# Altium PCB Watchdog PCB.PcbDoc
Units mm, origin at the board's own origin, x right, y up, seen from the top; angles counter-clockwise.
Board outline 103.05 x 62.58 mm, 4 copper layers (SIG 1, GND, PWR, SIG 2), stack 1.512 mm thick; 43 components, 51 nets, 438 pads, 143 vias.
Unrouted connection lines stored in the file: 83.
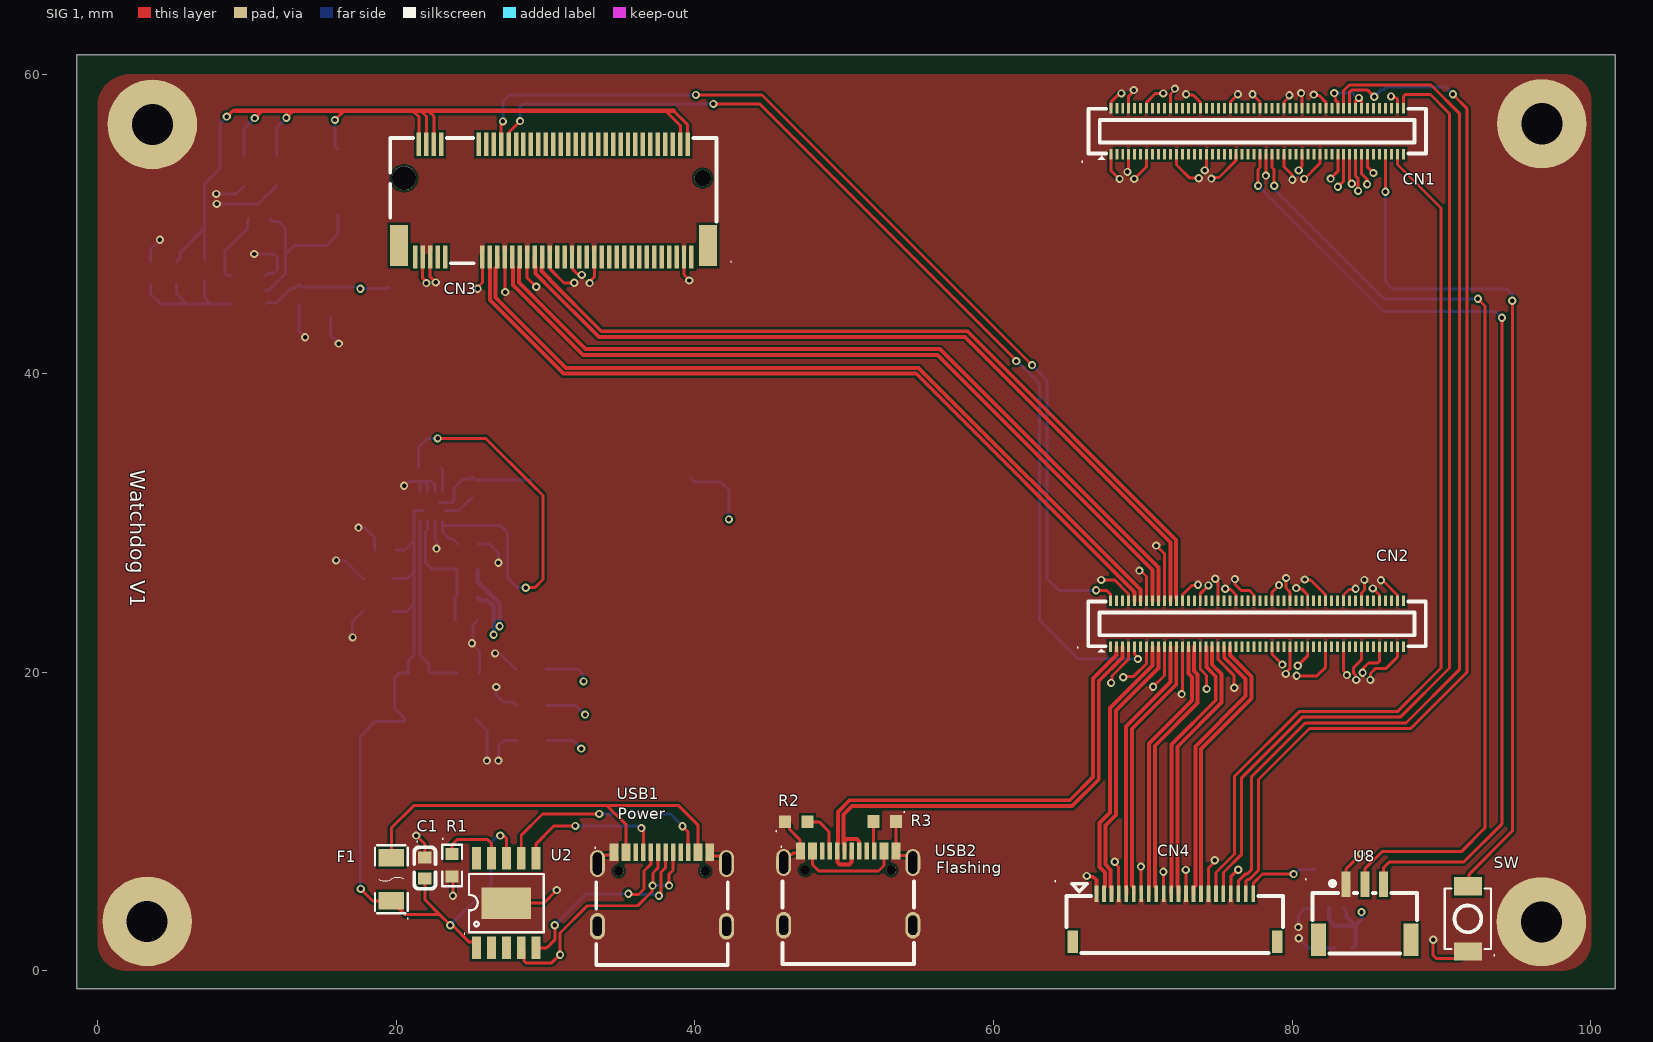
[diagram p0: SIG 1 view]
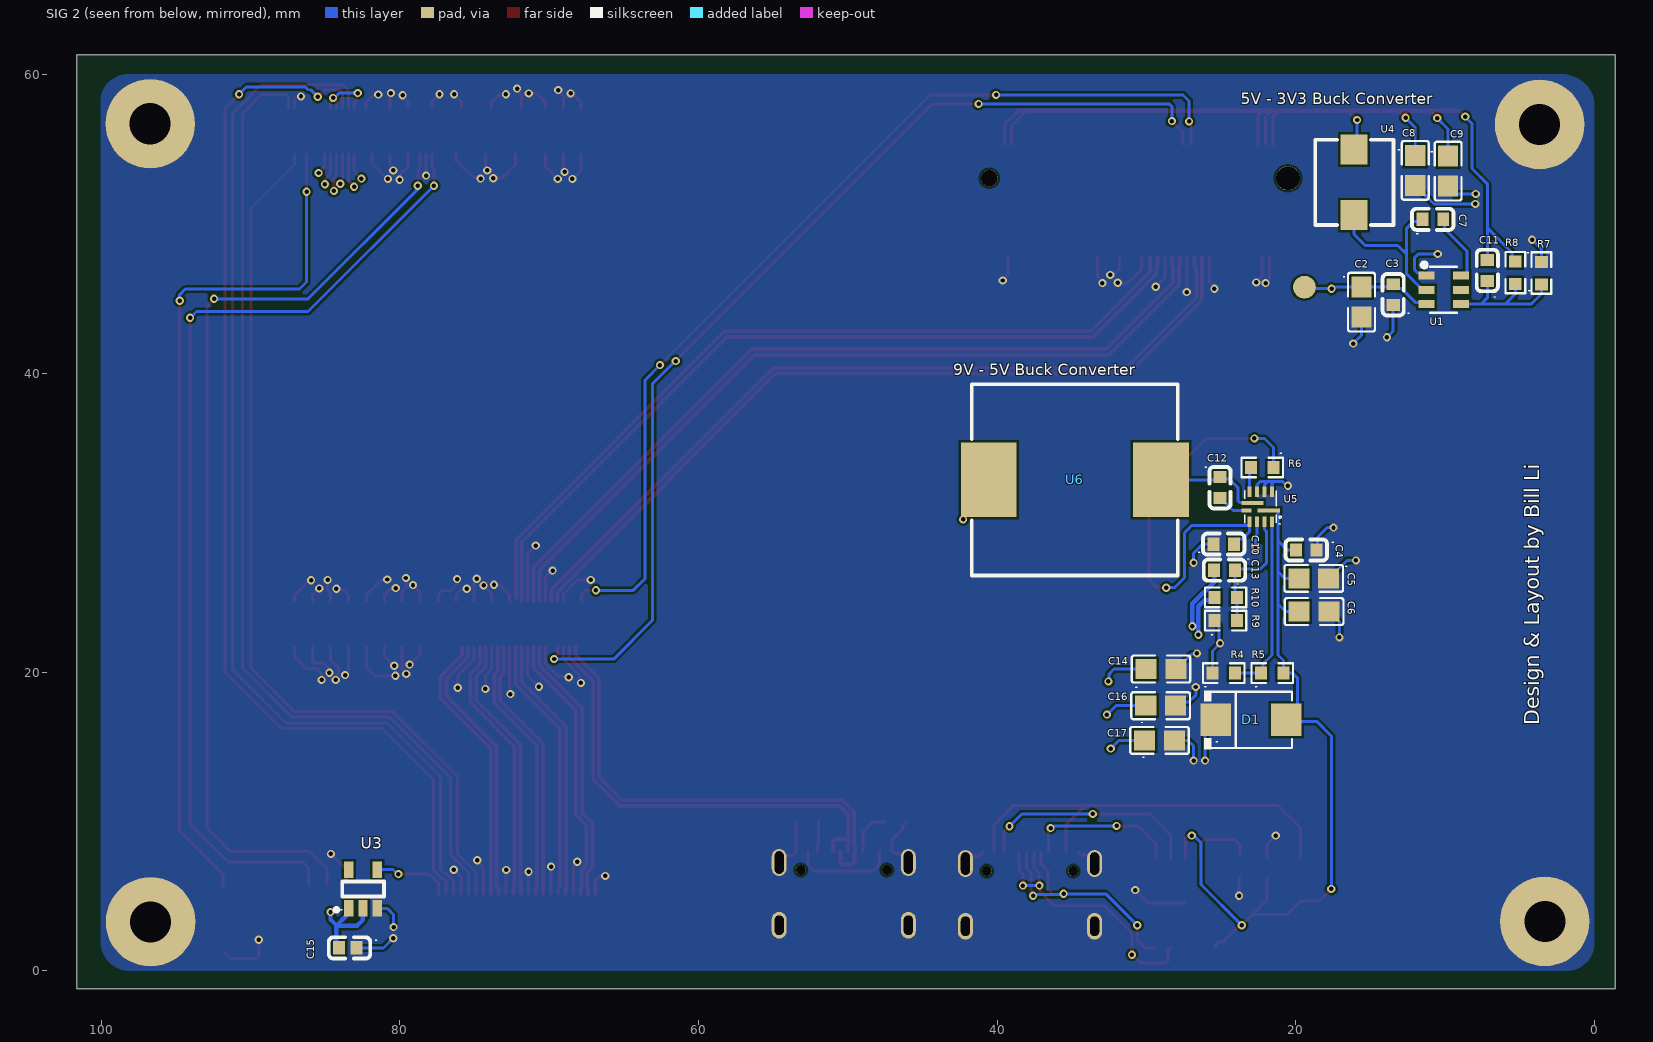
[diagram p1: SIG 2 view, seen from below]
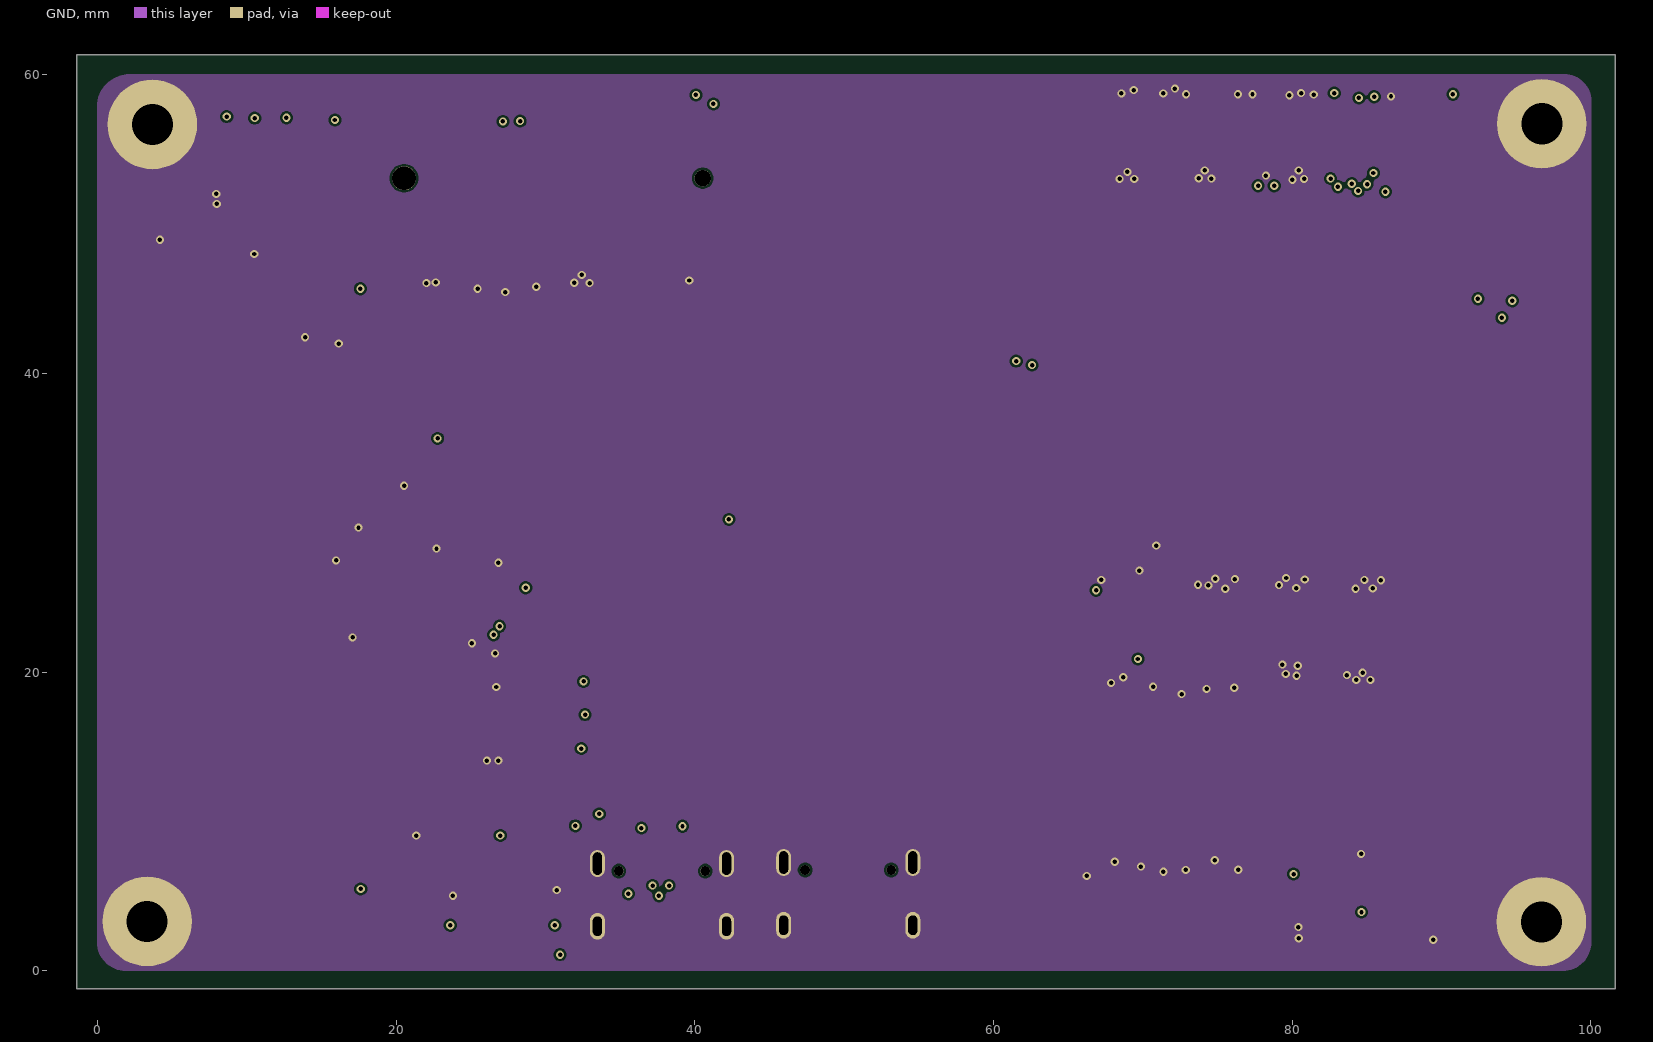
[diagram p2: GND]
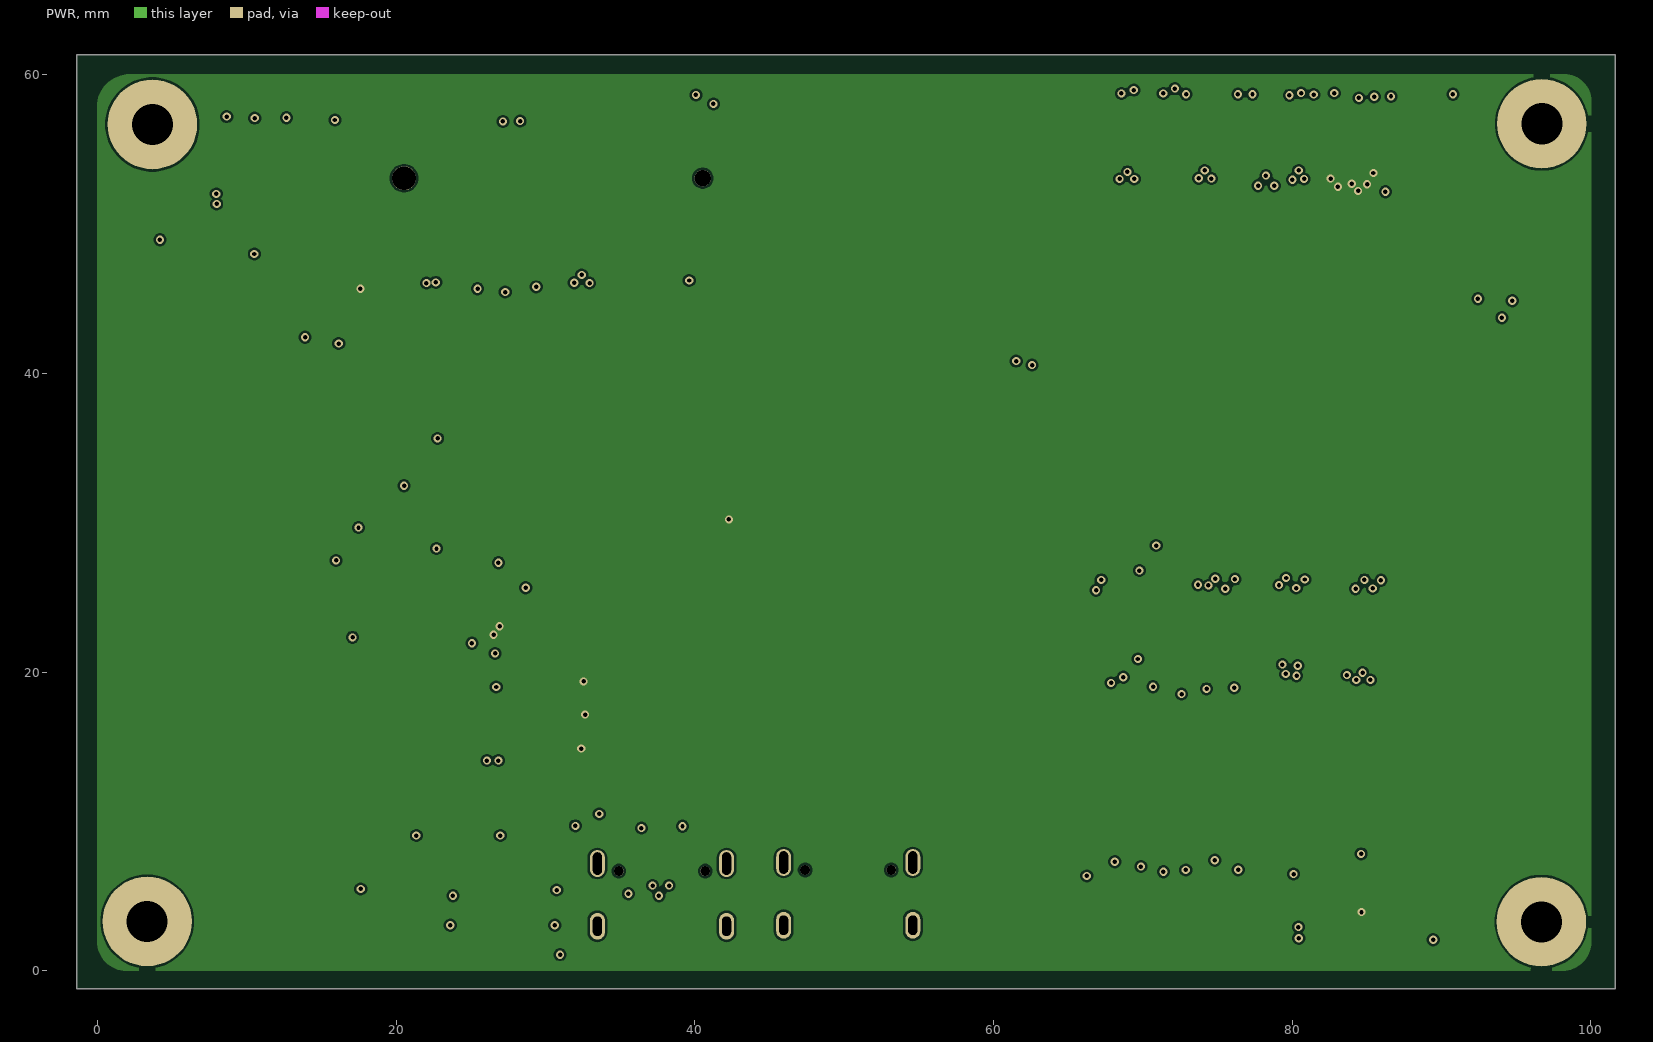
[diagram p3: PWR]
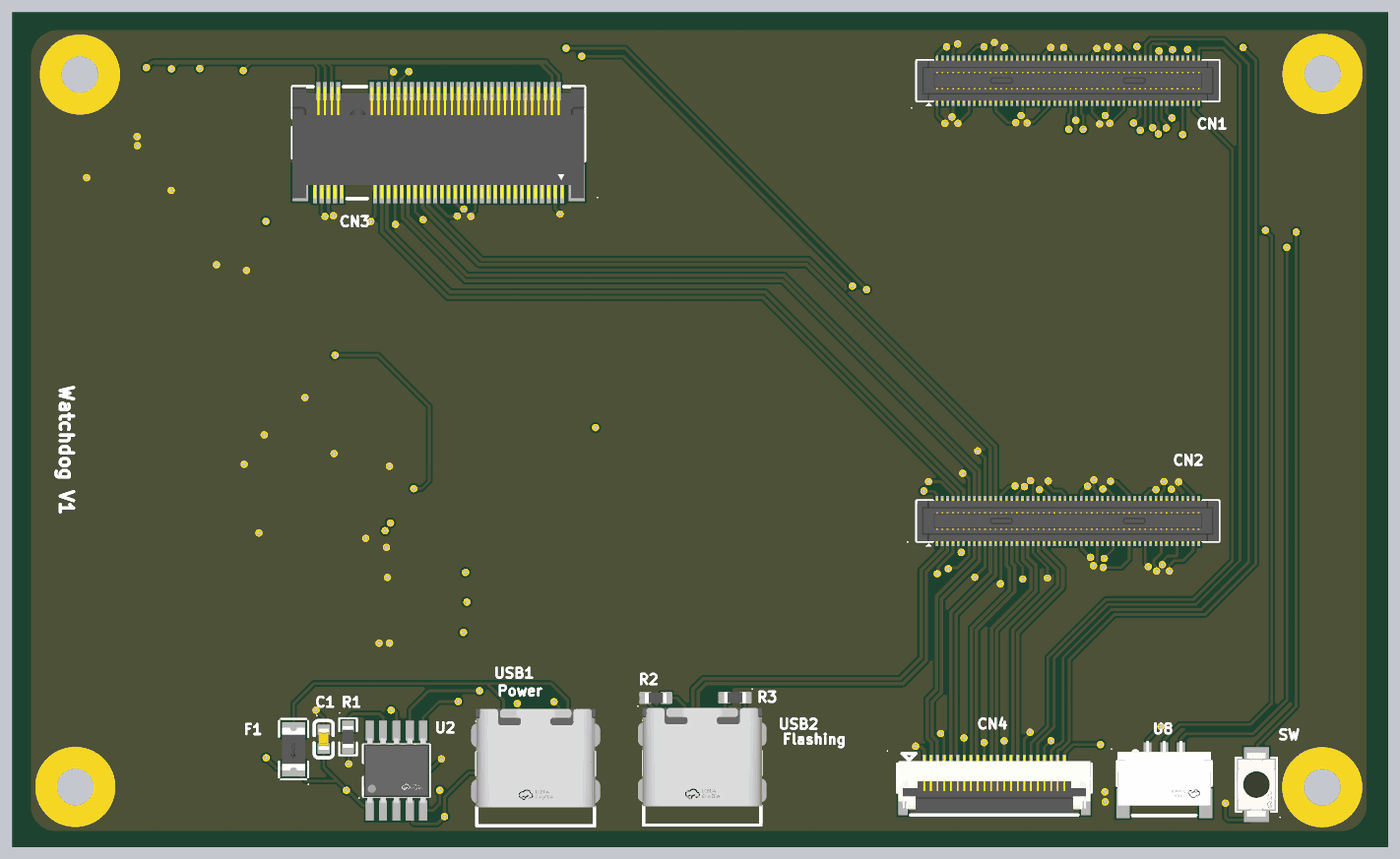
[diagram p4: 3D render of the assembled board from above, using the file's embedded part models]
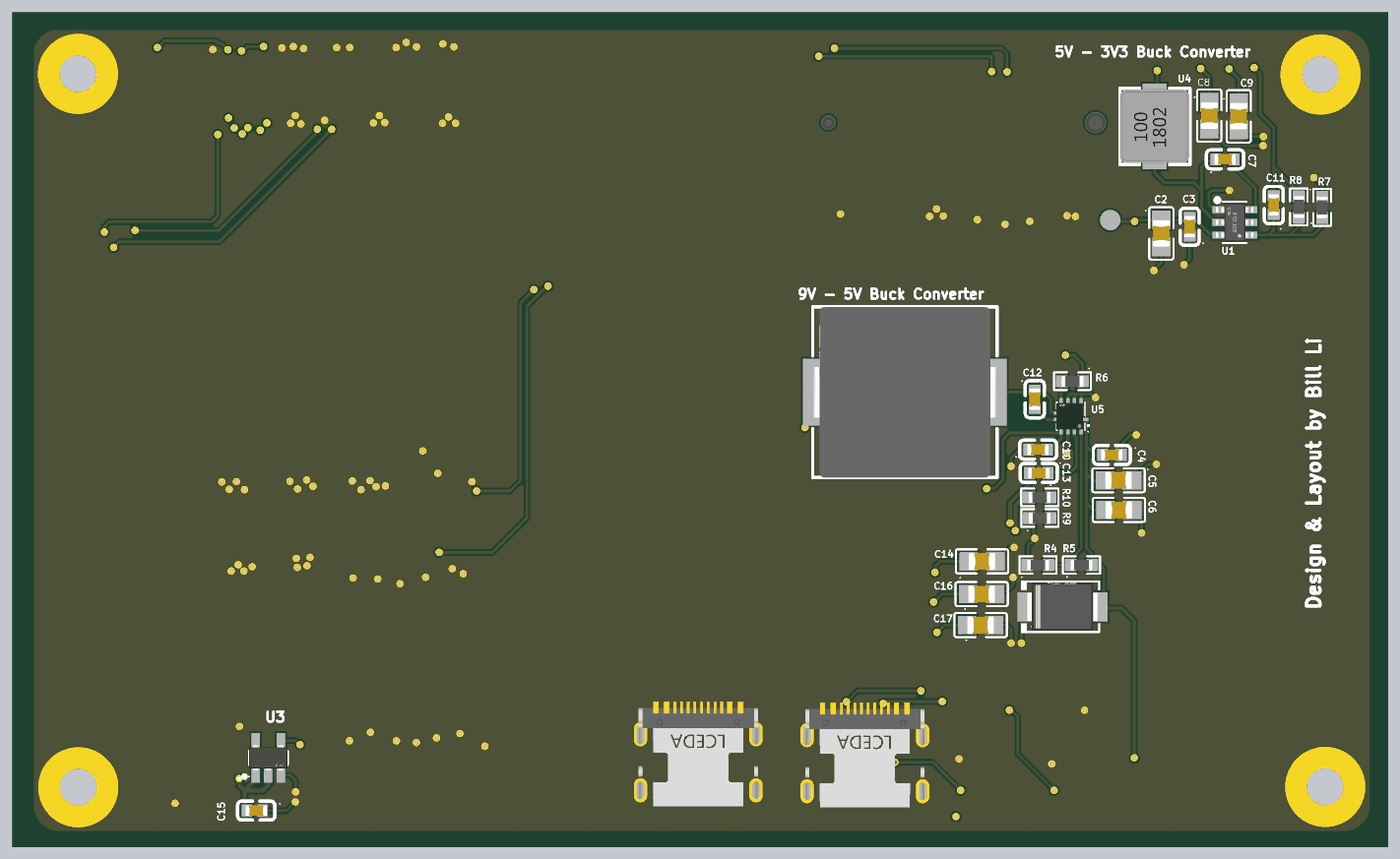
[diagram p5: 3D render of the assembled board from below, using the file's embedded part models]

## Layer stack, top to bottom
Top Solder: solder mask 0.0152, Solder Resist, Dk 3.5
SIG 1: signal copper 0.0432
Dielectric 2: prepreg 0.1999, FR408HR, Dk 3.61
GND: signal copper 0.0175
Dielectric 1: dielectric 0.9906, FR408HR, Dk 3.61
PWR: signal copper 0.0175
Dielectric 3: prepreg 0.1999, FR408HR, Dk 3.61
SIG 2: signal copper 0.0432
Bottom Solder: solder mask 0.0152, Solder Resist, Dk 3.5

## Board outline
-1.4,-1.225 101.65,-1.225 101.65,61.35 -1.4,61.35

## Design rules (kind name [scope] priority, off if disabled: settings)
BoardOutlineClearance [All] p1: gap=0.254 ignorepadtopadclearanceinfootprint=FALSE except(0: Arc-SplitContinuation Track-SplitContinuation SMDPad-SplitContinuation THPad-SplitContinuation Via-SplitContinuation Fill-SplitContinuation Poly-SplitContinuation Region-SplitContinuation Text-SplitContinuation; 0.2: Arc-OutlineEdge Track-CavityEdge Track-CutoutEdge Track-SplitBarrior Poly-CavityEdge Poly-CutoutEdge Poly-SplitBarrior Text-OutlineEdge; 0.4: Track-OutlineEdge SMDPad-OutlineEdge THPad-OutlineEdge Via-OutlineEdge Fill-OutlineEdge Poly-OutlineEdge Region-OutlineEdge)
Clearance CAM_D3_Pair [InNet('CAM_D3_N') vs InNet('CAM_D3_P')] p1: gap=0.1 ignorepadtopadclearanceinfootprint=TRUE
Clearance CAM_D2_Pair [InNet('CAM_D2_N') vs InNet('CAM_D2_P')] p2: gap=0.1 ignorepadtopadclearanceinfootprint=TRUE
Clearance CAM_D1_Pair [InNet('CAM_D1_N') vs InNet('CAM_D1_P')] p3: gap=0.1 ignorepadtopadclearanceinfootprint=TRUE
Clearance CAM_D0_Pair [InNet('CAM_D0_N') vs InNet('CAM_D0_P')] p4: gap=0.1 ignorepadtopadclearanceinfootprint=TRUE
Clearance CAM_CLK_N [InNet('CAM_CLK_N') vs InNet('CAM_CLK_P')] p5: gap=0.1 ignorepadtopadclearanceinfootprint=TRUE
Clearance PCIE_CLK_Pair [InNet('PCIE_CLK_P') vs InNet('PCIE_CLK_N')] p6: gap=0.1 ignorepadtopadclearanceinfootprint=TRUE
Clearance PCIE_RX_Pair [InNet('PCIE_RX_N') vs InNet('PCIE_RX_P')] p7: gap=0.1 ignorepadtopadclearanceinfootprint=TRUE
Clearance PCIE_TX_Pair [InNet('PCIE_TX_N') vs InNet('PCIE_TX_P')] p8: gap=0.1 ignorepadtopadclearanceinfootprint=TRUE
Clearance USB_Pair [InNet('USB_N') vs InNet('USB_P')] p9: gap=0.1 ignorepadtopadclearanceinfootprint=TRUE
Clearance "Regular Clearance" [All] p10: gap=0.15 ignorepadtopadclearanceinfootprint=TRUE
DiffPairsRouting USB_DiffPair [All] p1: maxlimit=0.127 minlimit=0.127 mostfreqgap=0.127 toplayer_minwidth=0.26 toplayer_maxwidth=0.26 toplayer_prefwidth=0.26 bottomlayer_minwidth=0.26 bottomlayer_maxwidth=0.26 bottomlayer_prefwidth=0.26 impedanceprofiledriven=TRUE impedanceprofileid={312E05CD-DBFE-4CD3-A864-9E920D600580} impedanceprofilevalue=90.000000 maxuncoupledlength=12.7
DiffPairsRouting [All] p2: maxlimit=0.127 minlimit=0.127 mostfreqgap=0.127 toplayer_minwidth=0.192 toplayer_maxwidth=0.192 toplayer_prefwidth=0.192 bottomlayer_minwidth=0.192 bottomlayer_maxwidth=0.192 bottomlayer_prefwidth=0.192 impedanceprofiledriven=TRUE impedanceprofileid={0BA38044-EBC8-4669-95C4-1F31DD3EDEAA} impedanceprofilevalue=100.000000 maxuncoupledlength=12.7
HoleSize [All] p1: absolutevalues=TRUE maxlimit=3 minlimit=0.025 maxpercent=80.000 minpercent=20.000
MinimumSolderMaskSliver [All] p1: minsoldermaskwidth=0.05
PlaneConnect [All] p1: planeconnectstyle=Direct reliefexpansion=0.508 reliefentries=4 reliefconductorwidth=0.254 reliefairgap=0.254
PolygonConnect [All] p1: connectstyle=Direct reliefconductorwidth=0.254 reliefentries=4 polygonreliefangle="90 Angle" airgapwidth=0.254
RoutingVias [All] p1: holewidth=0.3 width=0.45 viastyle="Through Hole" minholewidth=0.3 minwidth=0.45 maxholewidth=0.3 maxwidth=0.6
SilkToSilkClearance [All] p1: silktosilkclearance=0.15
SilkToSolderMaskClearance [IsPad] p1: minsilkscreentomaskgap=0.1 clearancetoexposedcopper=TRUE
SolderMaskExpansion [All] p1: expansion=0 istentingtop=FALSE
SupplyNets "Schematic Supply Nets" [InNet('GND')] p1: voltage=0.000
Width [All] p1: maxlimit=0.5 minlimit=0.2 preferedwidth=0.2
24 further rules are at their usual default settings.

## Classes and differential pairs
component class USBC_Protection: C1 F1 R1 R2 R3 U2 USB1 USB2
component class "Power Rails": C2 C3 C4 C5 C6 C7 C8 C9 C10 C11 C12 C13 C14 C15 C16 C17 D1 R4 R5 R6 R7 R8 R9 R10 U1 U3 U4 U5 U6
component class "M.2 & CSI2": CN3 CN4
component class "Amphenol ICC": CN1 CN2 SW U8
differential pair PCIE_TX: +PCIE_TX_P -PCIE_TX_N
differential pair PCIE_RX: +PCIE_RX_P -PCIE_RX_N
differential pair PCIE_CLK: +PCIE_CLK_P -PCIE_CLK_N
differential pair CAM_D3: +CAM_D3_P -CAM_D3_N
differential pair CAM_D2: +CAM_D2_P -CAM_D2_N
differential pair CAM_D1: +CAM_D1_P -CAM_D1_N
differential pair CAM_D0: +CAM_D0_P -CAM_D0_N
differential pair CAM_CLK: +CAM_CLK_P -CAM_CLK_N
differential pair USB: +USB_P -USB_N

## Components (designator, comment, footprint, x,y, rotation, side; value= is the part's Value field where it differs from the comment)
C1 "CC0603KRX5R9BB105" C0603#1 21.925,6.875 r270 top value=1uF
C2 "CL21A226MAQNNNE" C0805 15.6,44.775 r270 bottom value=22uF
C3 "CL10B104JB8NNNC" C0603#1 13.475,45.275 r90 bottom value=100nF
C4 "CL10B104JB8NNNC" C0603#1 19.3,28.175 r0 bottom value=100nF
C5 "CL21A226MAQNNNE" C0805 18.8,26.275 r0 bottom value=22uF
C6 "CL21A226MAQNNNE" C0805 18.775,24.05 r0 bottom value=22uF
C7 "CL10B104JB8NNNC" C0603#1 10.825,50.325 r180 bottom value=100nF
C8 "CL21A226MAQNNNE" C0805 12,53.6 r270 bottom value=22uF
C9 "CL21A226MAQNNNE" C0805 9.8,53.55 r270 bottom value=22uF
C10 "CC0603KRX5R9BB105" C0603#1 24.825,28.575 r180 bottom value=1uF
C11 "0603CG470J500NT" C0603#1 7.175,46.9 r90 bottom value=47pF
C12 "CL10B224KA8NNNC" C0603#1 25.075,32.35 r270 bottom value=220nF
C13 "TCC0603COG330F500CT" C0603#1 24.775,26.825 r0 bottom value=33pF
C14 "CL21A226MAQNNNE" C0805 29.025,20.2 r180 bottom value=22uF
C15 "CC0603KRX5R9BB105" C0603#2 83.375,1.525 r0 bottom value=1uF
C16 "CL21A226MAQNNNE" C0805 29.05,17.75 r180 bottom value=22uF
C17 "CL21A226MAQNNNE" C0805 29.125,15.425 r180 bottom value=22uF
CN1 "10164227-1001A1RLF" CONN-SMD_100P-P0.40_10164227-1001A1RLF 77.66,56.222 r0 top
CN2 "10164227-1001A1RLF" CONN-SMD_100P-P0.40_10164227-1001A1RLF 77.65,23.225 r0 top
CN3 "91302-42-067RDM" CONN-SMD_91302-32-067RDM 30.525,51.575 r180 top
CN4 "CSI Connector" FPC-SMD_22P-P0.50_FH55-22S-0.5SH 72.15,3.549 r0 top
D1 "TVS" SMB_L4.6-W3.6-LS5.3-RD 23,16.8 r180 bottom
F1 "Fuse" F1206 19.675,6.125 r90 top
R1 "CQ03WAJ0682T5E" R0603 23.75,7.05 r270 top value=6.8k
R2 "0603WAF5101T5E" R0603 46.8,9.975 r0 top value=5.1K
R3 "0603WAF5101T5E" R0603 52.725,10 r180 top value=5.1K
R4 "0603WAF1003T5E" R0603 24.828,19.925 r180 bottom value=100k
R5 "0603WAF4533T5E" R0603 21.575,19.925 r180 bottom value=453k
R6 "0603WAF1003T5E" R0603 22.25,33.7 r0 bottom value=100k
R7 "RT0603BRD0722K1L" R0603 3.55,46.725 r270 bottom value=22.1k
R8 "0603WAF1003T5E" R0603 5.3,46.75 r90 bottom value=100k
R9 "FRQ0603F5491TS" R0603 24.7,23.45 r180 bottom value=5.49k
R10 "0603WAF4022T5E" R0603 24.703,25 r0 bottom value=40.2k
SW "TS-1088R-02026" SW-SMD_L3.9-W3.0-P4.45 91.775,3.475 r270 top
U1 "TPS54302DDCR" SOT-23-6_L2.9-W1.6-P0.95-LS2.8-BL 10.1,45.6 r270 bottom
U2 "CH224A" ESSOP-10_L4.9-W3.9-P1.0-LS6.0-TL-EP 27.375,4.525 r0 top
U3 "AP2112K-3.3TRG1" SOT-25-5_L2.9-W1.6-P0.95-LS2.8-BL 82.475,5.475 r180 bottom
U4 "CXP0530-6R8M-AG(6.8uh)" IND-SMD_L5.7-W5.2 16.1,52.8 r90 bottom value=6.8uH
U5 "MP2329GG-Z" QFN-11_L2.0-W2.0-P0.50_MP2384CGG-Z 22.451,31.075 r0 bottom
U6 "CYA1250-3.3UH" IND-SMD_L13.8-W12.8 34.8,32.875 r0 bottom value=3.3uH
U8 "UART" CONN-TH_SM03B-GHS-TB-LF-SN 84.875,3.925 r0 top
USB1 "TYPEC-304J-BCP16" USB-C-SMD_TYPEC-304J-BCP16 37.8,5.456 r0 top
USB2 "TYPEC-304J-BCP16" USB-C-SMD_TYPEC-304J-BCP16 50.275,5.525 r0 top

## Footprints (in the part's own frame and the unit in brackets; to place one, negate y for a bottom-side part, rotate by r counter-clockwise, add the part's x,y. Pads: shape width x height; smd on the part's side, far side on the other; paste and mask are expansions set on the pad)
C0603#1 [mm] "1uF ±10% 50V Ceramic Capacitor X5R 0603"
  rect 0.8x0.9 smd: 1(-0.7,0) 2(0.7,0)
  silkscreen extent -1.81,-0.71 1.39,0.71, body extent -1.3,-0.53 0.3,0.27, height 0.03
C0603#2 [mm] "1uF ±10% 50V Ceramic Capacitor X5R 0603"
  rect 0.8x0.9 smd: 1(-0.475,0) 2(0.7,0)
  silkscreen extent -1.81,-0.71 1.39,0.71, body extent -0.8,-0.4 0.8,0.4, height 0.4
C0805 [mm] "22uF ±20% 25V Ceramic Capacitor X5R 0805"
  rect 1.41x1.35 smd: 1(-1,0) 2(1,0)
  silkscreen extent -1.96,-1.2 1.96,0.9, body extent -1,-0.65 1,0.65, height 0.65
CONN-SMD_100P-P0.40_10164227-1001A1RLF [mm] "100 Position Board to Board Connector Surface Mount,P=0.4mm Gold"
  rect 0.2x0.7 smd: 1(-9.8,-1.54) 2(-9.8,1.54) 3(-9.4,-1.54) 4(-9.4,1.54) 5(-9,-1.54) 6(-9,1.54) 7(-8.6,-1.54) 8(-8.6,1.54) 9(-8.2,-1.54) 10(-8.2,1.54) 11(-7.8,-1.54) 12(-7.8,1.54) 13(-7.4,-1.54) 14(-7.4,1.54) 15(-7,-1.54) 16(-7,1.54) 17(-6.6,-1.54) 18(-6.6,1.54) 19(-6.2,-1.54) 20(-6.2,1.54) 21(-5.8,-1.54) 22(-5.8,1.54) 23(-5.4,-1.54) 24(-5.4,1.54) 25(-5,-1.54) 26(-5,1.54) 27(-4.6,-1.54) 28(-4.6,1.54) 29(-4.2,-1.54) 30(-4.2,1.54) 31(-3.8,-1.54) 32(-3.8,1.54) 33(-3.4,-1.54) 34(-3.4,1.54) 35(-3,-1.54) 36(-3,1.54) 37(-2.6,-1.54) 38(-2.6,1.54) 39(-2.2,-1.54) 40(-2.2,1.54) 41(-1.8,-1.54) 42(-1.8,1.54) 43(-1.4,-1.54) 44(-1.4,1.54) 45(-1,-1.54) 46(-1,1.54) 47(-0.6,-1.54) 48(-0.6,1.54) 49(-0.2,-1.54) 50(-0.2,1.54) 51(0.2,-1.54) 52(0.2,1.54) 53(0.6,-1.54) 54(0.6,1.54) 55(1,-1.54) 56(1,1.54) 57(1.4,-1.54) 58(1.4,1.54) 59(1.8,-1.54) 60(1.8,1.54) 61(2.2,-1.54) 62(2.2,1.54) 63(2.6,-1.54) 64(2.6,1.54) 65(3,-1.54) 66(3,1.54) 67(3.4,-1.54) 68(3.4,1.54) 69(3.8,-1.54) 70(3.8,1.54) 71(4.2,-1.54) 72(4.2,1.54) 73(4.6,-1.54) 74(4.6,1.54) 75(5,-1.54) 76(5,1.54) 77(5.4,-1.54) 78(5.4,1.54) 79(5.8,-1.54) 80(5.8,1.54) 81(6.2,-1.54) 82(6.2,1.54) 83(6.6,-1.54) 84(6.6,1.54) 85(7,-1.54) 86(7,1.54) 87(7.4,-1.54) 88(7.4,1.54) 89(7.8,-1.54) 90(7.8,1.54) 91(8.2,-1.54) 92(8.2,1.54) 93(8.6,-1.54) 94(8.6,1.54) 95(9,-1.54) 96(9,1.54) 97(9.4,-1.54) 98(9.4,1.54) 99(9.8,-1.54) 100(9.8,1.54)
  silkscreen extent -11.74,-2.08 11.3,1.5, body extent -11.3,-1.69 11.3,1.69, height 0.03
CONN-SMD_91302-32-067RDM [mm] "67P Surface Mount, Right Angle SMD,P=0.5mm Centronics Connectors RoHS"
  rect 0.3x1.55 smd: 1(-9.25,3.775) 2(-9,-3.775) 3(-8.75,3.775) 4(-8.5,-3.775) 5(-8.25,3.775) 6(-8,-3.775) 7(-7.75,3.775) 8(-7.5,-3.775) 9(-7.25,3.775) 10(-7,-3.775) 11(-6.75,3.775) 12(-6.5,-3.775) 13(-6.25,3.775) 14(-6,-3.775) 15(-5.75,3.775) 16(-5.5,-3.775) 17(-5.25,3.775) 18(-5,-3.775) 19(-4.75,3.775) 20(-4.5,-3.775) 21(-4.25,3.775) 22(-4,-3.775) 23(-3.75,3.775) 24(-3.5,-3.775) 25(-3.25,3.775) 26(-3,-3.775) 27(-2.75,3.775) 28(-2.5,-3.775) 29(-2.25,3.775) 30(-2,-3.775) 31(-1.75,3.775) 32(-1.5,-3.775) 33(-1.25,3.775) 34(-1,-3.775) 35(-0.75,3.775) 36(-0.5,-3.775) 37(-0.25,3.775) 38(0,-3.775) 39(0.25,3.775) 40(0.5,-3.775) 41(0.75,3.775) 42(1,-3.775) 43(1.25,3.775) 44(1.5,-3.775) 45(1.75,3.775) 46(2,-3.775) 47(2.25,3.775) 48(2.5,-3.775) 49(2.75,3.775) 50(3,-3.775) 51(3.25,3.775) 52(3.5,-3.775) 53(3.75,3.775) 54(4,-3.775) 55(4.25,3.775) 56(4.5,-3.775) 57(4.75,3.775) 58(5,-3.775) 67(7.25,3.775) 68(7.5,-3.775) 69(7.75,3.775) 70(8,-3.775) 71(8.25,3.775) 72(8.5,-3.775) 73(8.75,3.775) 74(9,-3.775) 75(9.25,3.775)
  rect 1.2x2.75 smd: 76(-10.35,3) 76(10.35,3)
  round 1.1 hole 1.1 unplated: ""(-10,-1.5)
  round 1.6 hole 1.6 unplated: ""(10,-1.5)
  silkscreen extent -11.93,-4.19 10.92,4.19, body extent -10.92,-4.23 10.92,4.12, height 0.7
CONN-TH_SM03B-GHS-TB-LF-SN [mm] "Connector Header 3 position 1.25mm Pitch 1A Surface Mount, Right Angle -25?~+85?"
  rect 0.6x1.7 smd: 1(-1.25,1.854) 2(0,1.854) 3(1.25,1.854)
  rect 1x2.2 smd: 4(3.1,-1.854) 5(-3.1,-1.854)
  silkscreen extent -3.98,-2.77 3.5,2.23, body extent -3.5,-2.77 3.5,2.08, height 0.03
ESSOP-10_L4.9-W3.9-P1.0-LS6.0-TL-EP [mm] "Power Receiver Controller 1C 140W ESSOP-10 Power Management - Specialized RoHS"
  rect 0.6x1.5 smd: 1(-2,-3) 2(-1,-3) 3(0,-3) 4(1,-3) 5(2,-3) 6(2,3) 7(1,3) 8(0,3) 9(-1,3) 10(-2,3)
  rect 3.3x2.1 smd: 11(0,0)
  silkscreen extent -2.83,-2.08 2.5,1.95, body extent -2.45,-3 2.45,3, height 0.73
F1206 [mm] "3A Fuse Surface Mount 1206"
  rect 1.19x1.728 smd: 1(-1.445,0) 2(1.445,0)
  silkscreen extent -2.65,-1.13 2.27,1.09, body extent -1.6,-0.85 1.6,0.85, height 0.03
FPC-SMD_22P-P0.50_FH55-22S-0.5SH [mm] "Flip-Top -55?~+85? 22P 0.5mm 500mA 50V Gold Surface Mount, Right Angle Phosphor bronze SMD,P=0.5mm FFC, FPC (Flat Flexible) Connector Assemblies RoHS"
  rect 0.7x1.5 smd: 0(-6.85,-1.601) 0(6.85,-1.601)
  rect 0.25x1.1 smd: 1(-5.248,1.599) 2(-4.749,1.599) 3(-4.251,1.601) 4(-3.75,1.601) 5(-3.25,1.601) 6(-2.751,1.601) 7(-2.251,1.601) 8(-1.75,1.601) 9(-1.25,1.601) 10(-0.751,1.601) 11(-0.25,1.601) 12(0.25,1.601) 13(0.749,1.601) 14(1.25,1.601) 15(1.75,1.601) 16(2.25,1.601) 17(2.749,1.601) 18(3.25,1.601) 19(3.749,1.601) 20(4.249,1.601) 21(4.75,1.601) 22(5.25,1.601)
  silkscreen extent -8.03,-2.36 7.25,2.48, body extent -7.2,-2.35 7.2,1.9, height 0.03
IND-SMD_L5.7-W5.2 [mm] "3.5A 6.8uH ±20% 5A 70m? Molded inductor SMD,5.7x5.2mm Fixed Inductors"
  rect 2x1.8 smd: 1(-2.2,0) 2(2.2,0)
  silkscreen extent -2.88,-2.64 2.85,2.6, body extent -2.85,-2.6 2.85,2.61, height 2.8
IND-SMD_L13.8-W12.8 [mm] "20A 3.3uH ±20% 32A Molded inductor SMD,13.8x12.8mm Fixed Inductors"
  rect 3.735x5 smd: 1(-5.768,0) 2(5.768,0)
  silkscreen extent -6.93,-6.43 6.9,6.4, body extent -6.9,-6.4 6.9,6.4, height 6
QFN-11_L2.0-W2.0-P0.50_MP2384CGG-Z [mm] "QFN-11_L2.0-W2.0-P0.50_MP2384CGG-Z"
  rect 1.5x0.25 smd: 1(-0.651,0.25) 6(0.451,-0.25)
  rect 0.25x0.7 smd: 2(-0.85,-1) 3(-0.35,-1) 4(0.15,-1) 5(0.65,-1) 8(0.65,1) 9(0.15,1) 10(-0.35,1) 11(-0.85,1)
  rect 0.7x0.25 smd: 7(0.85,0.25)
  silkscreen extent -1.47,-1.06 0.98,1.18, body extent -1,-1 1,1, height 0.91
R0603 [mm] "6.8k? ±5% 100mW 0603 Thick Film Resistor AEC-Q200"
  rect 0.806x0.864 smd: 1(-0.753,0) 2(0.753,0)
  silkscreen extent -1.81,-0.66 1.39,0.66, body extent -0.4,-0.81 0.4,0.81, height 0.03
SMB_L4.6-W3.6-LS5.3-RD [mm] "21.5VC Clamp 28A@10/1000us Ipp TVS DIODE DO-214AA"
  rect 2.047x2.192 smd: 1(-2.361,0) 2(2.361,0)
  silkscreen extent -3.12,-1.96 2.74,1.96, body extent -2.7,-1.8 2.7,1.8, height 2
SOT-23-6_L2.9-W1.6-P0.95-LS2.8-BL [mm] "Buck Switching Regulator IC Adjustable 1 Output 3A TSOT-23-6"
  rect 0.532x1.072 smd: 1(-0.95,-1.149) 2(0,-1.149) 3(0.95,-1.149) 4(0.95,1.149) 5(0,1.149) 6(-0.95,1.149)
  silkscreen extent -1.82,-1.45 1.54,0.89, body extent -1.45,-1.41 1.45,1.41, height 1.6
SOT-25-5_L2.9-W1.6-P0.95-LS2.8-BL [mil] "3.3V Positive Fixed SOT-25-5 Voltage Regulators - Linear, Low Drop Out (LDO) Regulators RoHS"
  rect 24.5x43.5 smd: 1(-37.39,-51.18) 2(-0.02,-51.18) 3(37.39,-51.18) 4(37.39,51.18) 5(-37.39,51.18)
  silkscreen extent -75,-60 56,20, body extent -57,-55 57,55, height 43
SW-SMD_L3.9-W3.0-P4.45 [mm] "Tactile Switch SPST 2mm 3.9mm x 2.93mm Surface Mount"
  rect 1.23x1.86 smd: 1(-2.185,0) 2(2.185,0)
  silkscreen extent -2.03,-1.54 2.48,1.8, body extent -2.4,-1.45 2.4,1.45, height 0.03
USB-C-SMD_TYPEC-304J-BCP16 [mm] "USB-C (USB TYPE-C) Receptacle Connector 16 Position Surface Mount, Right Angle"
  rrect100% 1x1.8 hole 0.6 slot 1.5 at 90 deg: 13(-4.325,1.719) 14(4.325,1.719)
  rrect100% 1x1.8 hole 0.6 slot 1.3 at 90 deg: 15(-4.325,-2.481) 16(4.325,-2.481)
  rect 0.6x1.15 smd: A1B12(-3.2,2.481) A4B9(-2.4,2.481) B1A12(3.2,2.481) B4A9(2.4,2.481)
  rect 0.3x1.15 smd: A5(-1.25,2.481) A6(-0.25,2.481) A7(0.25,2.481) A8(1.25,2.481) B5(1.75,2.481) B6(0.75,2.481) B7(-0.75,2.481) B8(-1.75,2.481)
  round 0.65 hole 0.65 unplated: ""(-2.89,1.219) ""(2.89,1.219)
  silkscreen extent -4.5,-5.08 4.4,2.8, body extent -4.47,-5.07 4.47,2.78, height 2

## Part data
C1 C10 C15: "1uF ±10% 50V Ceramic Capacitor X5R 0603", Name=C128624, Source=JLCPCB
C2 C5 C6 C8 C9 C14 C16 C17: "22uF ±20% 25V Ceramic Capacitor X5R 0805", Name=C45783, Source=JLCPCB
C3 C4 C7: "100nF ±5% 50V Ceramic Capacitor X7R 0603", Name=C24452, Source=JLCPCB
C11: "47pF ±5% 50V Ceramic Capacitor C0G 0603", Name=C94904, Source=JLCPCB
C12: "220nF ±10% 25V Ceramic Capacitor X7R 0603", Name=C21120, Source=JLCPCB
C13: "33pF C0G ±1% 50V 0603 Ceramic Capacitors", Name=C48543706, Source=JLCPCB
CN1 CN2: "100 Position Board to Board Connector Surface Mount,P=0.4mm Gold", Name=C6782225, Source=JLCPCB
CN3: "67P Surface Mount, Right Angle SMD,P=0.5mm Centronics Connectors RoHS", Name=C601195, Source=LCSC
CN4: library part FH55-22S-0.5SH, "Flip-Top -55â„ƒ~+85â„ƒ 22P 0.5mm 500mA 50V Gold Surface Mount, Right Angle Phosphor bronze SMD,P=0.5mm FFC, FPC (Flat Flexible) Connector Assemblies RoHS", Name=C5182313, Source=LCSC
D1: library part SMBJ12A_C151251, "21.5VC Clamp 28A@10/1000us Ipp TVS DIODE DO-214AA", Name=C151251, Source=JLCPCB
F1: library part 1206T3A63V, "3A Fuse Surface Mount 1206", Name=C354897, Source=JLCPCB
R1: "6.8kÎ© Â±5% 100mW 0603 Thick Film Resistor AEC-Q200", Name=C2770993, Source=JLCPCB
R2 R3: "5.1kÎ© Â±1% 100mW 0603 Thick Film Resistor", Name=C23186, Source=JLCPCB
R4 R6 R8: "100kÎ© Â±1% 100mW 0603 Thick Film Resistor", Name=C25803, Source=JLCPCB
R5: "453kÎ© Â±1% 100mW 0603 Thick Film Resistor", Name=C25818, Source=JLCPCB
R7: "22.1kÎ© 100mW 75V Thin Film Resistor Â±25ppm/â„ƒ Â±0.1% 0603 Chip Resistor - Surface Mount RoHS", Name=C723484, Source=JLCPCB
R9: "5.49kÎ© 100mW 75V Thick Film Resistor Â±100ppm/â„ƒ Â±1% 0603 Chip Resistor - Surface Mount", Name=C54102278, Source=JLCPCB
R10: "40.2kÎ© Â±1% 100mW 0603 Thick Film Resistor", Name=C12447, Source=JLCPCB
SW: "Tactile Switch SPST 2mm 3.9mm x 2.93mm Surface Mount", Name=C455280, Source=JLCPCB
U1: library part TPS54302DDCR_C311983, "Buck Switching Regulator IC Adjustable 1 Output 3A TSOT-23-6", Name=C311983, Source=JLCPCB
U2: "Power Receiver Controller 1C 140W ESSOP-10 Power Management - Specialized RoHS", Name=C42459160, Source=JLCPCB
U3: "3.3V Positive Fixed SOT-25-5 Voltage Regulators - Linear, Low Drop Out (LDO) Regulators RoHS", Name=C51118, Source=JLCPCB
U4: library part CXP0530-6R8M-AG_6.8UH, "3.5A 6.8uH Â±20% 5A 70mÎ© Molded inductor SMD,5.7x5.2mm Fixed Inductors", Name=C7461350, Source=JLCPCB
U6: "20A 3.3uH ±20% 32A Molded inductor SMD,13.8x12.8mm Fixed Inductors", Name=C19268654, Source=JLCPCB
U8: library part SM03B-GHS-TB_LF_SN, "Connector Header 3 position 1.25mm Pitch 1A Surface Mount, Right Angle -25â„ƒ~+85â„ƒ", Name=C514175, Source=JLCPCB
USB1 USB2: "USB-C (USB TYPE-C) Receptacle Connector 16 Position Surface Mount, Right Angle", Name=C2835315, Source=JLCPCB
U5: Name=C5349327, Source=JLCPCB

## Free pads (board coordinates)
  round 6 hole 2.75: 1(3.675,56.675) 2(3.325,3.3) 3(96.725,56.725) 4(96.7,3.275)
  round 1.524 smd far side paste-2539.97: TP(19.425,45.775)

## Via types
v1: diameter 0.55, hole 0.3, SIG 1 to SIG 2, 143 vias

## Nets (pads, with @x,y where several pads share a name; then routed paths per layer and width w, separated by ;. In a path a pad name is that pad's centre, name@x,y a point inside that pad or via, vN(x,y) a via of type N, cw(c..) or ccw(c..) an arc to the next point about the centre after c; other vN are vias at no path point)
5V: C2.1 C3.2 C13.2 C14.1 C15.2 C16.1 C17.1 CN1.77 CN1.79 CN1.81 CN1.83 CN1.85 CN1.87 pad.TP R10.2 U1.3 U3.1 U3.2 U6.2 | length 49.2
  SIG 1 w0.2: v1(82.575,53.05) 83.06,53.535 CN1.77 ; v1(83.075,52.5) 83.46,52.885 CN1.79 ; CN1.81 83.86,52.908 84,52.768 v1(84,52.7) ; CN1.83 84.26,53.215 84.425,53.05 v1(84.425,52.225) ; CN1.85 84.66,53.365 85.016,53.009 85.016,52.684 v1(85.025,52.675) ; CN1.87 85.06,53.815 v1(85.45,53.425)
  SIG 2 w0.2: U1.3 11.342,44.743 11.968,44.743 12.9,45.675 13.175,45.675 C3.2 13.675,45.775 C2.1 17.432,45.775 17.532,45.675 19.561,45.675 pad.TP ; C14.1 32.175,20.2 32.502,19.873 32.502,19.423 v1(32.55,19.375) ; C16.1 32.05,17.75 v1(32.65,17.15) ; C17.1 31.85,15.425 v1(32.4,14.875) ; U6.2@39.718,33 40.003,32.715 41.768,32.715 42.282,32.2 v1(42.282,30.225) ; U3.1 83.636,3.964 U3.1@83.636,3.639
  SIG 2 w0.3: R10.2 25.658,24.798 26.127,24.798 26.525,24.4 v1(26.525,22.5) ; C13.2 25.475,26.025 26.925,24.575 v1(26.925,23.075) ; U3.2 82.476,3.399 82.85,3.025 84.25,3.025 ; U3.1@83.636,3.639 84.25,3.025 ; C15.2 84.25,1.7 84.25,3.025 ; v1(84.65,3.925) 84.65,3.425 84.25,3.025
  other v1: 17.6,45.675
CAM_CLK_N: CN2.27 CN4.8 | length 17.8
  SIG 1 w0.26: CN4.8 70.405,5.155 70.405,5.622 70.43,5.647 70.43,15.228 73.288,18.085 73.288,19.679 73.056,19.91 73.056,21.679 CN2.27
CAM_CLK_P: CN2.29 CN4.9 | length 17.9
  SIG 1 w0.26: CN4.9 70.9,5.565 70.818,5.647 70.818,15.068 73.675,17.925 73.675,19.84 73.444,20.071 73.444,21.679 CN2.29
CAM_D0_N: CN2.15 CN4.2 | length 18.2
  SIG 1 w0.26: CN4.2 67.401,5.562 67.463,5.624 67.463,6.59 67.113,6.94 67.113,9.885 67.813,10.585 67.813,17.588 70.656,20.431 70.656,21.679 CN2.15
CAM_D0_P: CN2.17 CN4.3 | length 18.2
  SIG 1 w0.26: CN4.3 67.899,5.565 67.85,5.614 67.85,6.75 67.5,7.1 67.5,9.725 68.2,10.425 68.2,17.427 71.044,20.271 71.044,21.679 CN2.17
CAM_D1_N: CN2.21 CN4.5 | length 17.8
  SIG 1 w0.26: CN4.5 68.9,5.516 68.89,5.526 68.89,16.362 71.856,19.329 71.856,21.679 CN2.21
CAM_D1_P: CN2.23 CN4.6 | length 17.8
  SIG 1 w0.26: CN4.6 69.399,5.565 69.277,5.686 69.277,16.202 72.244,19.169 72.244,21.679 CN2.23
CAM_D2_N: CN2.33 CN4.11 | length 18
  SIG 1 w0.26: CN4.11 71.899,5.565 71.938,5.603 71.938,15.16 74.888,18.11 74.888,19.702 74.256,20.333 74.256,21.679 CN2.33
CAM_D2_P: CN2.35 CN4.12 | length 18.1
  SIG 1 w0.26: CN4.12 72.4,5.565 72.325,5.64 72.325,15 75.275,17.95 75.275,19.863 74.644,20.494 74.644,21.679 CN2.35
CAM_D3_N: CN2.39 CN4.14 | length 18.6
  SIG 1 w0.26: CN4.14 73.399,5.565 73.521,5.686 73.521,15.021 76.888,18.388 76.888,19.54 75.456,20.971 75.456,21.679 CN2.39
CAM_D3_P: CN2.41 CN4.15 | length 18.5
  SIG 1 w0.26: CN4.15 73.9,5.517 73.909,5.526 73.909,14.861 77.275,18.227 77.275,19.7 75.844,21.131 75.844,21.679 CN2.41
GND: C1.1 C2.2 C3.1 C4.1 C5.1 C6.1 C8.2 C9.2 C10.1 C14.2 C15.1 C16.2 C17.2 CN1.1 CN1.2 CN1.7 CN1.8 CN1.13 CN1.14 CN1.22 CN1.23 CN1.32 CN1.33 CN1.42 CN1.43 CN1.52 CN1.53 CN1.59 CN1.60 CN1.65 CN1.66 CN1.71 CN1.74 CN1.98 CN2.7 CN2.8 CN2.13 CN2.14 CN2.19 CN2.20 CN2.25 CN2.26 CN2.31 CN2.32 CN2.37 CN2.38 CN2.44 CN2.50 CN2.55 CN2.56 CN2.61 CN2.62 CN2.67 CN2.68 CN2.73 CN2.74 CN2.79 CN2.80 CN2.85 CN2.86 CN2.91 CN2.92 CN2.97 CN2.98 CN3.3 CN3.27 CN3.33 CN3.39 CN3.45 CN3.51 CN3.57 CN3.71 CN3.73 CN4.1 CN4.4 CN4.7 CN4.10 CN4.13 CN4.16 CN4.19 D1.1 pad.1 pad.2 pad.3 pad.4 R1.2 R2.1 R3.1 R4.1 R7.1 R9.1 SW.2 U1.1 U2.11 U3.3 U5.2 U5.3 U5.4 U5.9 U8.1 USB1.13 USB1.14 USB1.15 USB1.16 USB1.A1B12 USB1.B1A12 USB2.13 USB2.14 USB2.15 USB2.16 USB2.A1B12 USB2.B1A12 | length 203.3
  SIG 1 w0.2: v1(21.35,9.05) 21.925,8.475 C1.1 ; CN3.73 21.775,46.368 22.025,46.118 v1(22.025,46.05) ; CN3.71 22.275,46.475 v1(22.65,46.1) ; R1.2 23.8,6.247 v1(23.8,5.025) ; v1(25.45,45.675) 25.45,45.77 25.775,46.095 CN3.57 ; CN3.51 27.275,46.128 27.278,46.125 27.278,45.472 v1(27.3,45.45) ; U2.11 29.875,4.525 v1(30.75,5.4) ; CN3.45 28.775,46.4 v1(29.375,45.8) ; CN3.39 30.325,47.75 30.325,46.971 31.246,46.05 31.9,46.05 v1(31.925,46.075) ; CN3.33 31.825,47.75 31.825,46.972 32.13,46.667 32.358,46.667 v1(32.425,46.6) ; v1(32.95,46.05) 32.95,46.145 33.275,46.47 CN3.27 ; USB1.13 33.475,7.358 33.845,7.728 34.028,7.728 34.05,7.75 34.412,7.75 USB1.A1B12 ; CN3.3 39.275,46.618 39.625,46.268 v1(39.625,46.225) ; USB1.B1A12 41,7.875 41.2,7.675 41.808,7.675 42.125,7.358 USB1.14 ; USB2.13 45.95,7.427 46.32,7.797 46.503,7.797 46.581,7.875 46.944,7.875 USB2.A1B12 47.036,8.045 47.036,8.764 46.35,9.45 46.35,9.672 R2.1 ; USB2.B1A12@53.475,7.931 53.675,7.731 54.23,7.731 54.6,7.362 USB2.14 ; USB2.B1A12 53.475,9.997 R3.1 ; v1(67.225,26.175) 68.105,26.175 69.05,25.23 CN2.8 ; CN1.1 67.86,53.597 68.432,53.025 v1(68.45,53.025) ; CN1.2 67.86,58.165 68.397,58.702 68.527,58.702 v1(68.575,58.75) ; v1(67.875,19.275) 67.942,19.342 67.942,19.744 69.05,20.852 CN2.7 ; v1(68.125,7.3) 68.125,7.205 68.374,6.956 68.374,5.175 CN4.4 ; v1(68.7,19.65) 68.765,19.715 69.4,19.715 70.25,20.565 CN2.13 ; v1(68.975,53.5) 69.042,53.567 69.042,53.76 69.06,53.778 CN1.7 ; CN1.8 69.06,58.573 69.4,58.913 v1(69.4,58.975) ; v1(69.425,53.025) 70.26,53.86 CN1.13 ; v1(69.775,26.8) 69.85,26.8 70.25,26.4 CN2.14 ; v1(69.875,6.975) 69.887,6.963 69.887,5.162 CN4.7 ; CN1.14 70.26,58.165 70.845,58.75 v1(71.375,58.75) ; v1(70.687,19.013) 71.45,19.777 CN2.19 ; v1(70.9,28.475) 71.45,27.925 CN2.20 ; v1(71.382,6.625) 71.391,6.617 71.391,5.158 CN4.10 ; CN1.22 71.86,58.717 72.15,59.007 v1(72.15,59.075) ; CN1.23 72.26,53.965 73.15,53.075 v1(73.75,53.075) ; v1(72.6,18.525) 72.65,18.575 CN2.25 ; CN2.26 72.65,25.169 73.264,25.783 73.633,25.783 v1(73.7,25.85) ; v1(72.88,6.75) 72.89,6.741 72.89,5.159 CN4.13 ; v1(72.9,58.7) 72.948,58.652 73.373,58.652 73.86,58.165 CN1.32 ; CN2.31 73.85,20.202 74.275,19.777 v1(74.275,18.875) ; CN2.32 73.85,25.25 v1(74.4,25.8) ; v1(74.15,53.6) 74.15,53.695 74.26,53.805 CN1.33 ; CN4.16 74.4,6.88 74.825,7.305 v1(74.825,7.4) ; v1(74.6,53.05) 74.667,53.117 75.099,53.117 76.26,54.278 CN1.43 ; v1(74.85,26.25) 74.85,26.182 75.05,25.982 CN2.38 ; CN2.37 75.05,20.837 76.125,19.762 v1(76.125,18.95) ; v1(75.525,25.575) 75.573,25.527 75.891,25.527 76.25,25.169 CN2.44 ; CN1.42 75.86,58.185 v1(76.375,58.7) ; CN4.19 75.899,6.297 76.361,6.759 v1(76.391,6.759) ; v1(76.175,26.225) 76.175,25.875 76.575,25.475 77.143,25.475 77.45,25.169 CN2.50 ; v1(77.35,58.7) 77.86,58.19 CN1.52 ; v1(78.25,53.25) 78.26,53.26 CN1.53 ; CN2.55 78.65,21.2 v1(79.35,20.5) ; CN2.56 78.65,25.35 v1(79.125,25.825) ; CN1.59 79.46,53.84 80.004,53.296 80.004,52.996 v1(80.025,52.975) ; CN1.60 79.46,58.177 79.825,58.542 v1(79.825,58.625) ; v1(79.575,19.875) 79.575,19.943 79.85,20.218 CN2.61 ; v1(79.6,26.3) 79.6,25.628 79.85,25.378 CN2.62 ; v1(80.275,25.625) 80.323,25.577 80.642,25.577 81.05,25.169 CN2.68 ; v1(80.3,19.75) 81.675,19.75 82.25,20.325 CN2.73 ; v1(80.375,20.425) 81.05,21.1 CN2.67 ; v1(80.45,53.6) 80.45,53.668 80.66,53.878 CN1.65 ; v1(80.6,58.775) 80.66,58.715 CN1.66 ; v1(80.8,53.025) 80.825,53.025 81.86,54.06 CN1.71 ; v1(80.85,26.2) 80.898,26.152 81.266,26.152 82.25,25.169 CN2.74 ; v1(81.45,58.675) 81.498,58.627 81.798,58.627 82.26,58.165 CN1.74 ; CN2.79 83.45,20.093 83.675,19.868 v1(83.675,19.8) ; CN2.80 83.45,25.169 83.809,25.527 84.202,25.527 v1(84.25,25.575) ; U8.1 83.625,6.825 v1(84.625,7.825) ; v1(84.3,19.475) 84.252,19.523 84.252,19.798 84.1,19.95 84.1,20.275 84.65,20.825 CN2.85 ; CN2.86 84.65,25.303 84.85,25.503 v1(84.85,26.175) ; v1(84.725,19.95) 84.773,19.998 84.773,20.255 85.118,20.6 85.733,20.6 85.85,20.717 CN2.91 ; v1(85.25,19.475) 85.25,19.9 85.6,20.25 86.3,20.25 87.05,21 CN2.97 ; v1(85.4,25.6) 85.419,25.6 85.85,25.169 CN2.92 ; v1(85.95,26.15) 85.998,26.102 86.116,26.102 87.05,25.169 CN2.98 ; v1(86.625,58.55) 86.692,58.483 86.942,58.483 87.06,58.365 CN1.98 ; v1(89.45,2.075) 89.45,1.025 89.65,0.825 91.31,0.825 SW.2
  SIG 1 w0.25: v1(66.25,6.35) 66.307,6.293 66.682,6.293 66.902,6.072 CN4.1
  SIG 2 w0.2: R7.1 3.55,48.325 v1(4.175,48.95) ; v1(7.95,52.025) 9.275,52.025 C9.2 ; v1(7.975,51.35) 10.75,51.35 11.395,51.995 11.425,51.995 12,52.57 C8.2 ; v1(10.5,48) 11.8,48 12.05,47.75 12.05,46.95 11.816,46.716 11.415,46.716 U1.1 ; C3.1 13.475,42.85 v1(13.9,42.425) ; C2.2 15.6,42.55 v1(16.15,42) ; v1(15.975,27.475) 16.57,27.475 17.77,26.275 C5.1 ; v1(17.075,22.325) 17.075,23.35 17.17,23.445 17.17,23.475 17.745,24.05 C6.1 ; v1(17.475,29.675) 17.9,29.675 18.55,29.025 18.55,28.225 C4.1 ; v1(20.525,32.475) 20.593,32.475 20.868,32.75 21.484,32.75 ; U5.2 21.601,32.633 21.484,32.75 ; U5.3 22.088,32.088 22.088,32.562 21.9,32.75 ; U5.9 22.601,28.95 22.7,28.851 v1(22.7,28.275) ; U5.4 22.588,32.088 22.588,32.562 22.4,32.75 21.9,32.75 ; D1.1 26.075,16.086 v1(26.075,14.075) ; R9.1 25.15,23.147 25.15,22.068 25.075,21.993 v1(25.075,21.925) 25.582,21.418 R4.1 ; C10.1 26.225,28.575 26.848,27.952 26.848,27.327 v1(26.85,27.325) ; v1(26.625,21.25) 26.673,21.202 26.993,21.202 27.995,20.2 C14.2 ; v1(26.7,19) 26.7,18.45 27.162,17.988 27.812,17.988 C16.2 ; v1(26.85,14.075) 26.85,15.058 27.217,15.425 C17.2 ; v1(80.425,2.925) 80.425,3.75 80.85,4.175 U3.3 ; v1(80.45,2.175) 81.1,1.525 C15.1 ; 21.484,32.75 21.9,32.75
NetC1_2: C1.2 C4.2 C5.2 C6.2 D1.2 F1.1 R5.2 U2.1 U2.8 U5.1 | length 55.8
  SIG 1 w0.2: v1(17.625,5.475) 18.42,4.68 F1.1 20.605,3.75 22.925,3.75 ; C1.2 21.925,4.75 22.925,3.75 ; U2.1 25.375,1.708 25.175,1.908 24.892,1.908 23.798,3.002 23.673,3.002 22.925,3.75 ; v1(26.975,9.05) 27.023,9.002 27.246,9.002 27.375,8.873 U2.8
  SIG 2 w0.2: v1(17.625,5.475) 17.625,15.725 18.6,16.7 20.539,16.7 D1.2 19.9,17.539 19.9,19.625 20.2,19.925 R5.2 20.822,20.772 21.2,21.15 21.2,24.564 ; C6.2 20.686,24.05 21.2,24.564 ; C5.2 20.741,26.275 21.2,26.734 ; C4.2 20.008,28.183 20.583,28.183 21.2,28.8 ; U5.1 21.225,30.825 21.2,30.8 21.2,28.8 ; v1(23.625,3.05) 26.35,5.775 26.35,8.575 26.777,9.002 26.927,9.002 v1(26.975,9.05) ; 21.2,24.564 21.2,26.734 ; 21.2,26.734 21.2,28.8
NetC7_1: C7.1 U1.2 U4.1 | length 11.5
  SIG 2 w0.2: U1.2 11.519,45.6 12.544,46.625 12.575,46.625 12.575,47.975 ; C7.1 11.658,50.192 12.108,50.192 12.575,49.725 12.575,47.975 ; U4.1 16.1,49.325 15.35,48.575 13.175,48.575 12.575,47.975
NetC7_2: C7.2 U1.6 | length 4.8
  SIG 2 w0.2: U1.6 8.716,46.55 8.55,46.716 8.55,48.2 10.042,49.692 10.042,50.242 C7.2 C7.2@10.125,50.375
NetC8_1: C8.1 C9.1 C11.2 CN3.2 CN3.4 CN3.70 CN3.72 CN3.74 R8.2 U4.2 | length 65.8
  SIG 1 w0.2: v1(8.65,57.2) 9.05,57.6 9.203,57.6 ; v1(10.525,57.1) 11.025,57.6 11.09,57.6 ; v1(12.65,57.125) 13.125,57.6 13.167,57.6 ; v1(15.9,56.975) 16.525,57.6 ; 21.117,57.6 21.525,57.192 CN3.74 ; 21.633,57.6 22.025,57.208 CN3.72 ; 22.149,57.6 22.525,57.224 CN3.70 ; 38.033,57.6 39.025,56.608 CN3.4 ; 38.575,57.6 39.525,56.65 CN3.2
  SIG 1 w0.3: 9.203,57.6 11.025,57.6 ; 11.09,57.6 13.125,57.6 ; 13.167,57.6 16.525,57.6 21.117,57.6 21.633,57.6 22.149,57.6 38.033,57.6 38.575,57.6
  SIG 2 w0.2: R8.2 5.514,47.718 5.514,48.089 7.175,49.75 ; C11.2 7.175,49.75 ; v1(8.65,57.2) 8.65,57.175 8.2,56.725 8.2,53.725 7.175,52.7 7.175,49.75 ; C9.1 9.8,56.375 v1(10.525,57.1) ; C8.1 12,56.475 v1(12.65,57.125) ; v1(15.9,56.975) 15.9,55.2 U4.2
NetC10_2: C10.2 R6.1 U5.8 | length 29.6
  SIG 1 w0.2: v1(22.775,35.65) 26,35.65 29.075,32.575 29.825,31.825 29.825,26.2 29.275,25.65 v1(28.675,25.65)
  SIG 2 w0.2: R6.1 21.497,35.047 22.1,35.65 v1(22.775,35.65) ; U5.8 U5.8@23.101,29.85 ; C10.2 24.125,28.612 23.825,28.912 23.588,28.912 23.101,29.399 U5.8@23.101,29.85 ; v1(28.675,25.65) 28.125,25.65 27.45,26.325 27.45,29.325 26.95,29.825 23.126,29.825 U5.8@23.101,29.85
NetC11_1: C11.1 R7.2 R8.1 U1.4 | length 9.7
  SIG 2 w0.2: R7.2 3.55,45.325 4.225,44.65 5.97,44.65 ; R8.1 5.3,45.32 5.97,44.65 ; C11.1 7.175,45.063 7.588,44.65 ; U1.4 7.588,44.65 ; 5.97,44.65 7.588,44.65
NetC12_1: C12.1 U5.6 U6.1 | length 7.4
  SIG 2 w0.2: U5.6 22.927,31.35 23.758,31.35 23.875,31.467 23.875,32.35 24.442,32.917 24.942,32.917 C12.1 25.25,32.875 U6.1
NetC12_2: C12.2 U5.7 | length 2.1
  SIG 2 w0.2: U5.7 24.2,30.825 25.025,31.65 C12.2
NetC13_1: C13.1 R9.2 R10.1 U5.10 | length 8.6
  SIG 2 w0.2: U5.10 22.101,29.551 21.951,29.401 21.951,27.324 22.375,26.9 24,26.9 C13.1 24.075,25.125 R10.1 23.95,23.453 R9.2
NetCN1_51: CN1.51 U8.3 | length 66.3
  SIG 1 w0.2: v1(77.725,52.575) 77.725,53.65 77.86,53.785 CN1.51 ; U8.3 86.125,6.9 86.5,7.275 91.5,7.275 94.075,9.85 94.075,43.7 v1(94.05,43.725)
  SIG 2 w0.2: v1(77.725,52.575) 86.15,44.15 93.625,44.15 v1(94.05,43.725)
NetCN1_55: CN1.55 U8.2 | length 64.9
  SIG 1 w0.2: CN1.55 78.66,53.79 78.8,53.65 v1(78.8,52.575) ; U8.2 84.875,6.825 86.025,7.975 91.325,7.975 92.925,9.575 92.925,44.525 v1(92.45,45)
  SIG 2 w0.2: v1(78.8,52.575) 78.848,52.527 78.848,52.302 86.15,45 v1(92.45,45)
NetCN1_78: CN1.78 CN1.84 CN1.86 | length 4.4
  SIG 1 w0.2: v1(82.825,58.775) 82.892,58.708 82.892,58.333 83.06,58.165 CN1.78 ; CN1.84 84.26,58.236 v1(84.475,58.45) ; v1(84.475,58.45) 84.66,58.265 CN1.86
  SIG 2 w0.2: v1(82.825,58.775) 84.055,58.775 84.38,58.45 v1(84.475,58.45)
NetCN1_80: CN1.80 CN4.20 | length 72.3
  SIG 1 w0.2: CN4.20 76.399,6 76.86,6.461 76.982,6.461 77.289,6.768 77.289,12.989 80.888,16.588 87.638,16.588 91.2,20.15 91.2,57.425 89.3,59.325 83.832,59.325 83.46,58.953 CN1.80
NetCN1_82: CN1.82 CN4.21 | length 72.8
  SIG 1 w0.2: CN4.21 76.899,5.994 77.017,6.111 77.127,6.111 77.75,6.734 77.75,12.8 81.175,16.225 87.95,16.225 91.725,20 91.725,57.725 90.775,58.675 v1(90.775,58.7) ; CN1.82 83.86,58.858 83.977,58.975 85.062,58.975 v1(85.5,58.537)
  SIG 2 w0.2: v1(85.5,58.537) 85.504,58.537 85.968,59 86.153,59 86.353,59.2 90.275,59.2 v1(90.775,58.7)
NetCN1_93: CN1.93 SW.1 | length 58.3
  SIG 1 w0.2: v1(86.25,52.175) 86.26,52.185 CN1.93 ; SW.1 91.858,5.743 91.858,6.458 94.75,9.35 v1(94.75,44.875)
  SIG 2 w0.2: v1(86.25,52.175) 86.25,46.125 86.725,45.65 94.375,45.65 94.75,45.275 v1(94.75,44.875)
NetCN1_97: CN1.97 CN4.17 | length 60.8
  SIG 1 w0.2: CN4.17 74.899,6.569 76.15,7.82 76.15,13.025 80.475,17.35 87.05,17.35 89.975,20.275 89.975,51.075 87.06,53.99 CN1.97
NetCN1_100: CN1.100 CN4.18 | length 66.8
  SIG 1 w0.2: CN4.18 75.4,6.575 76.625,7.8 76.625,12.925 80.675,16.975 87.25,16.975 90.55,20.275 90.55,57.4 89.275,58.675 87.577,58.675 87.46,58.558 CN1.100
NetCN2_2: CN2.2 CN3.52 | length 65.9
  SIG 1 w0.2: CN3.52 27.025,56.682 27.15,56.807 v1(27.15,56.875) ; v1(40.075,58.65) 44.492,58.65 v1(62.584,40.559) ; v1(66.875,25.475) 66.9,25.45 67.6,25.45 67.85,25.2 CN2.2
  SIG 2 w0.2: v1(27.15,56.875) 27.15,58.25 27.55,58.65 v1(40.075,58.65) ; v1(62.584,40.559) 63.575,39.567 63.575,26.275 64.375,25.475 v1(66.875,25.475)
NetCN2_9: CN2.9 CN3.50 | length 69.9
  SIG 1 w0.2: CN3.50 27.575,55.4 27.575,56.179 27.771,56.375 27.775,56.375 v1(28.3,56.9) ; v1(41.25,58.05) 44.35,58.05 61.525,40.875 v1(61.525,40.825) ; CN2.9 69.45,21.195 69.675,20.97 v1(69.675,20.875)
  SIG 2 w0.2: v1(28.3,56.9) 28.3,57.875 28.475,58.05 v1(41.25,58.05) ; v1(61.525,40.825) 61.575,40.825 63.1,39.3 63.1,23.45 65.687,20.863 v1@69.675,20.863
NetCN4_22: CN4.22 U3.4 | length 5.2
  SIG 1 w0.2: CN4.22 77.4,5.85 78.025,6.475 v1(80.1,6.475)
  SIG 2 w0.2: v1(80.1,6.475) 80.168,6.475 80.468,6.775 U3.4
NetF1_2: F1.2 USB1.A4B9 USB1.B4A9 | length 29.1
  SIG 1 w0.2: F1.2 19.675,9.55 21.175,11.05 34.125,11.05 ; USB1.A4B9 35.4,9.775 34.125,11.05 ; USB1.B4A9 40.2,9.775 38.925,11.05 34.125,11.05
NetR1_1: R1.1 U2.9 | length 4.5
  SIG 1 w0.2: R1.1 23.75,8.45 24.075,8.775 26.125,8.775 26.375,8.525 U2.9
NetR2_2: R2.2 USB2.A5 | length 3
  SIG 1 w0.2: R2.2 48.325,9.975 48.975,9.325 48.975,8.056 USB2.A5
NetR3_2: R3.2 USB2.B5 | length 2
  SIG 1 w0.2: R3.2 51.972,8.485 52.025,8.431 USB2.B5
NetR4_2: R4.2 R5.1 U5.11 | length 12.2
  SIG 2 w0.2: U5.11 21.601,21.149 22.21,20.54 22.21,20.043 R5.1 R4.2
NetR6_2: R6.2 U5.5 | length 1.7
  SIG 2 w0.2: R6.2 23.101,33.602 U5.5
NetU2_4: U2.4 USB1.A6 USB1.B6 | length 18.7
  SIG 1 w0.2: U2.4 28.575,1.325 28.575,0.642 28.692,0.525 29.779,0.525 ; 29.779,0.525 30.425,0.525 v1(30.975,1.075) 30.975,2.525 32.8,4.35 36.175,4.35 37.125,5.3 37.125,5.652 v1(37.173,5.7) ; v1@37.191,5.7 37.2,5.709 37.2,6.55 37.55,6.9 USB1.A6 ; v1(38.275,5.7) 38.275,6.468 38.55,6.743 USB1.B6
  SIG 2 w0.2: v1(37.173,5.7) v1(38.275,5.7)
NetU2_5: U2.5 USB1.A7 USB1.B7 | length 17.3
  SIG 1 w0.2: U2.5 30.075,1.525 30.625,2.075 v1(30.625,3.05) ; v1(35.55,5.15) 35.6,5.1 36.225,5.1 36.6,5.475 36.6,6.675 37.05,7.125 USB1.B7 ; v1(37.6,5.025) 37.6,5.093 37.75,5.243 37.75,6.605 38.05,6.905 USB1.A7
  SIG 2 w0.2: v1(30.625,3.05) 32.725,5.15 v1(35.55,5.15) 35.612,5.088 37.537,5.088 v1(37.6,5.025)
NetU2_6: U2.6 USB1.A5 | length 10.2
  SIG 1 w0.2: U2.6 29.375,8.5 30.575,9.7 v1(32,9.7) ; v1(36.425,9.55) 36.425,9.482 36.55,9.357 USB1.A5
  SIG 2 w0.2: v1(32,9.7) 36.207,9.7 36.357,9.55 v1(36.425,9.55)
NetU2_7: U2.7 USB1.B5 | length 15.2
  SIG 1 w0.2: U2.7 28.375,9.075 29.8,10.5 v1(33.6,10.5) ; v1(39.175,9.675) 39.55,9.3 USB1.B5
  SIG 2 w0.2: v1(33.6,10.5) 38.35,10.5 v1(39.175,9.675)
NetUSB2_A4B9: USB2.A4B9 USB2.B4A9 | length 7
  SIG 1 w0.2: USB2.A4B9 47.875,7.1 48.3,6.675 52.3,6.675 52.675,7.05 USB2.B4A9
PCIE_CLK_N: CN2.12 CN3.53 | length 54.8
  SIG 1 w0.26: CN3.53 26.775,47.175 26.662,47.063 26.662,45.085 31.373,40.375 54.991,40.375 69.844,25.522 69.844,24.771 CN2.12
PCIE_CLK_P: CN2.10 CN3.55 | length 54.8
  SIG 1 w0.26: CN3.55 26.275,44.925 31.212,39.988 54.83,39.988 69.456,25.362 69.456,24.771 CN2.10
PCIE_RX_N: CN2.18 CN3.47 | length 54.7
  SIG 1 w0.26: CN3.47 28.275,47.175 28.219,47.119 28.219,46.079 32.673,41.625 56.425,41.625 71.044,27.006 71.044,24.771 CN2.18
PCIE_RX_P: CN2.16 CN3.49 | length 54.7
  SIG 1 w0.26: CN3.49 27.775,47.175 27.831,47.119 27.831,45.919 32.512,41.238 56.265,41.238 70.656,26.846 70.656,24.771 CN2.16
PCIE_TX_N: CN2.24 CN3.41 | length 54.8
  SIG 1 w0.26: CN3.41 29.775,47.175 29.719,47.119 29.719,46.857 30.293,46.283 30.293,46.268 33.736,42.825 58.25,42.825 72.237,28.838 CN2.24@72.237,24.985
PCIE_TX_P: CN2.22 CN3.43 | length 55
  SIG 1 w0.26: CN3.43 29.275,47.175 29.331,47.119 29.331,46.697 29.905,46.123 29.905,46.108 33.575,42.438 58.09,42.438 71.85,28.677 CN2.22
USB_N: CN2.3 USB2.A7 USB2.B7 | length 32.6
  SIG 1 w0.26: USB2.A7 50.505,7.986 50.505,7.278 50.353,7.125 49.697,7.125 49.545,7.278 49.545,7.986 USB2.B7 49.525,8.431 49.581,8.488 49.581,10.629 50.365,11.412 65.112,11.412 66.663,12.963 66.663,19.56 68.25,21.148 CN2.3
USB_P: CN2.5 USB2.A6 USB2.B6 | length 31.8
  SIG 1 w0.26: USB2.A6 50.025,8.431 49.969,8.488 49.969,8.672 49.969,10.469 50.525,11.025 65.273,11.025 67.05,12.802 67.05,19.4 68.637,20.987 68.637,21.672 CN2.5 ; 50.045,8.672 50.198,8.825 50.853,8.825 51.005,8.672 51.005,8.026 USB2.B6
pads on no net: CN1.3 CN1.4 CN1.5 CN1.6 CN1.9 CN1.10 CN1.11 CN1.12 CN1.15 CN1.16 CN1.17 CN1.18 CN1.19 CN1.20 CN1.21 CN1.24 CN1.25 CN1.26 CN1.27 CN1.28 CN1.29 CN1.30 CN1.31 CN1.34 CN1.35 CN1.36 CN1.37 CN1.38 CN1.39 CN1.40 CN1.41 CN1.44 CN1.45 CN1.46 CN1.47 CN1.48 CN1.49 CN1.50 CN1.54 CN1.56 CN1.57 CN1.58 CN1.61 CN1.62 CN1.63 CN1.64 CN1.67 CN1.68 CN1.69 CN1.70 CN1.72 CN1.73 CN1.75 CN1.76 CN1.88 CN1.89 CN1.90 CN1.91 CN1.92 CN1.94 CN1.95 CN1.96 CN1.99 CN2.1 CN2.4 CN2.6 CN2.11 CN2.28 CN2.30 CN2.34 CN2.36 CN2.40 CN2.42 CN2.43 CN2.45 CN2.46 CN2.47 CN2.48 CN2.49 CN2.51 CN2.52 CN2.53 CN2.54 CN2.57 CN2.58 CN2.59 CN2.60 CN2.63 CN2.64 CN2.65 CN2.66 CN2.69 CN2.70 CN2.71 CN2.72 CN2.75 CN2.76 CN2.77 CN2.78 CN2.81 CN2.82 CN2.83 CN2.84 CN2.87 CN2.88 CN2.89 CN2.90 CN2.93 CN2.94 CN2.95 CN2.96 CN2.99 CN2.100 CN3. CN3.1 CN3.5 CN3.6 CN3.7 CN3.8 CN3.9 CN3.10 CN3.11 CN3.12 CN3.13 CN3.14 CN3.15 CN3.16 CN3.17 CN3.18 CN3.19 CN3.20 CN3.21 CN3.22 CN3.23 CN3.24 CN3.25 CN3.26 CN3.28 CN3.29 CN3.30 CN3.31 CN3.32 CN3.34 CN3.35 CN3.36 CN3.37 CN3.38 CN3.40 CN3.42 CN3.44 CN3.46 CN3.48 CN3.54 CN3.56 CN3.58 CN3.67 CN3.68 CN3.69 CN3.75 CN3.76 CN4.0 U1.5 U2.2 U2.3 U2.10 U3.5 U8.4 U8.5 USB1. USB1.A8 USB1.B8 USB2. USB2.A8 USB2.B8

## Polygon pours and split planes (outlines as drawn)
GND on SIG 2 "SIG2_L04_P002" (solid, remove dead copper, pour order 2): 0,57.9 0,1.875 ccw(c1.875,1.875) 1.875,0 98.125,0 ccw(c98.125,1.9) 100.025,1.9 100.025,58.225 ccw(c98.225,58.225) 98.225,60.025 2.125,60.025 ccw(c2.125,57.9)
GND on SIG 1 "SIG1_L01_P000" (solid, remove dead copper, pour order 0): 2.125,60.025 98.225,60.025 cw(c98.225,58.225) 100.025,58.225 100.025,1.9 cw(c98.125,1.9) 98.125,0 1.875,0 cw(c1.875,1.875) 0,1.875 0,57.9 cw(c2.125,57.9)
5V on PWR "5V_L03_P004" (solid, pour order 4): 2.15,60.025 98.25,60.025 cw(c98.25,58.25) 100.025,58.25 100.025,1.9 cw(c98.125,1.9) 98.125,0 1.925,0 cw(c1.925,1.95) -0.025,1.95 -0.025,57.85 cw(c2.15,57.85)
GND on GND "GND_L02_P003" (solid, pour order 3): 2.125,60.025 98.25,60.025 cw(c98.25,58.25) 100.025,58.25 100.025,1.875 cw(c98.15,1.875) 98.15,0 1.875,0 cw(c1.875,1.9) -0.025,1.9 -0.025,57.875 cw(c2.125,57.875)

## Silkscreen, mask and mechanical layers (free items; w line width, h text height)
Top Overlay:
  text "Watchdog V1" at 2.187,33.546 h1 r270
  text "Power" at 34.825,10.15 h0.75
  text "Flashing" at 56.175,6.525 h0.75
Bottom Overlay:
  text "5V - 3V3 Buck Converter" at 23.7,58.025 h0.75
  text "9V - 5V Buck Converter" at 42.95,39.875 h0.75
  text "Design & Layout by Bill Li" at 3.712,16.454 h1 r270
Bottom Paste:
  circle w0.762: c19.425,45.775 r0.381
Mechanical 13:
  lines w0.15: 0,0.025 0,60.025 100,60.025